# Altium PCB ePBR20_HVB_rev1.PcbDoc
Units mil, origin at the board's own origin, x right, y up, seen from the top; angles counter-clockwise.
Board outline 3050 x 7070 mil, 2 copper layers (Top Layer, Bottom Layer); 40 components, 32 nets, 117 pads, 17 vias.
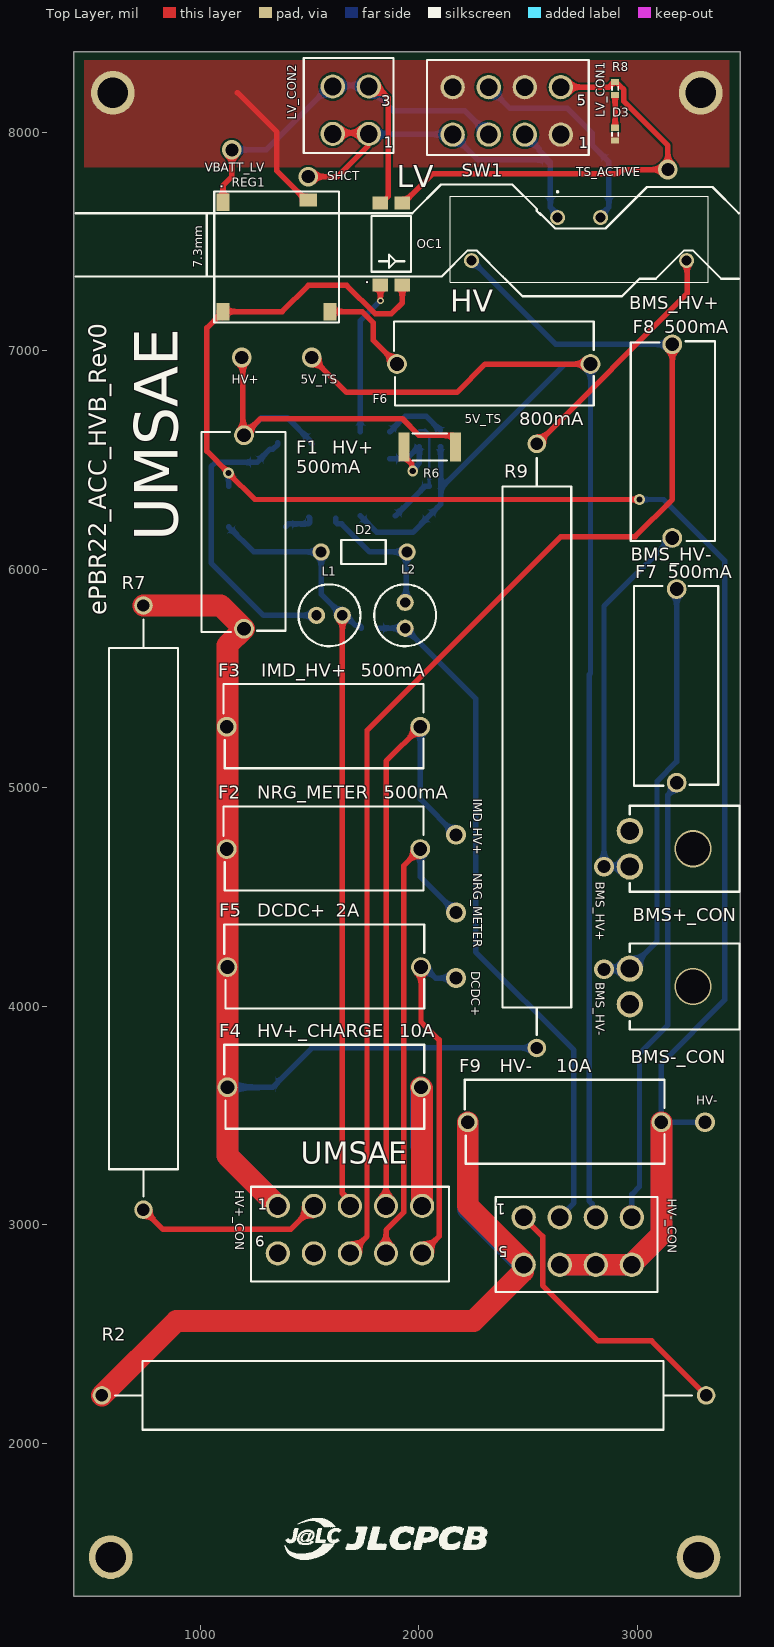
[diagram p0: Top Layer view]
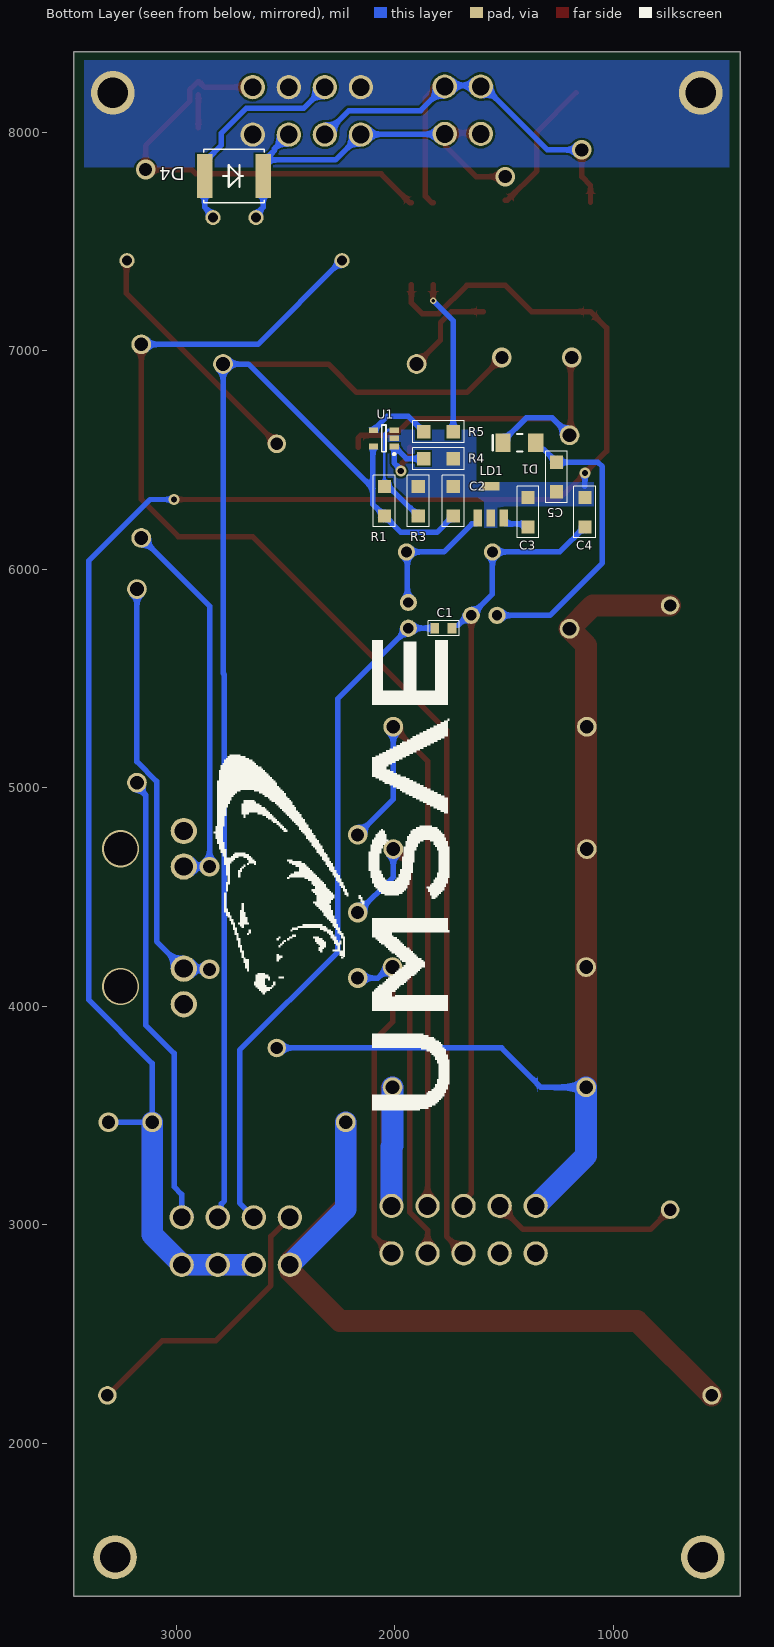
[diagram p1: Bottom Layer view, seen from below]
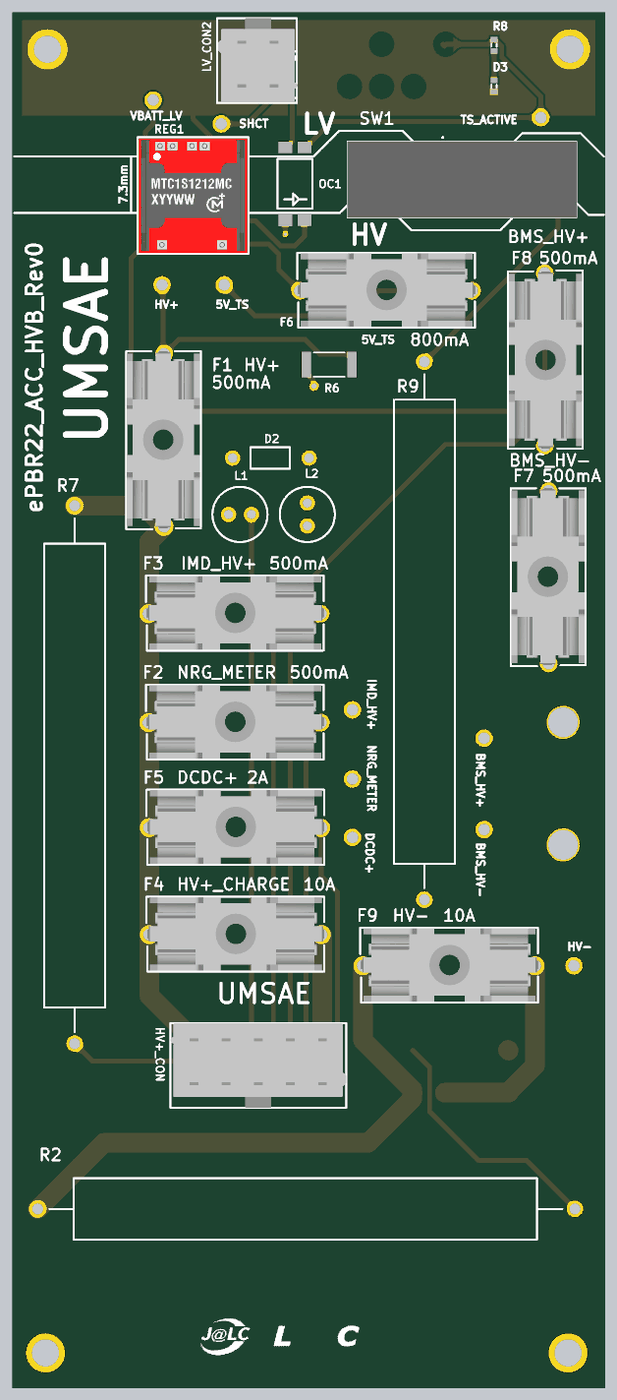
[diagram p2: 3D render of the assembled board from above, using the file's embedded part models]

## Layer stack, top to bottom
Top Solder: solder mask 0.4, Solder Resist, Dk 3.5
Top Layer: signal copper 1.4
Dielectric 1: dielectric 12.6, FR-4, Dk 4.8
Bottom Layer: signal copper 1.4
Bottom Solder: solder mask 0.4, Solder Resist, Dk 3.5

## Board outline
420,1300 3470,1300 3470,8370 420,8370

## Design rules (kind name [scope] priority, off if disabled: settings)
Clearance [All] p1: gap=10 ignorepadtopadclearanceinfootprint=FALSE
HoleSize [All] p1: absolutevalues=TRUE maxlimit=200 minlimit=15 maxpercent=80.000 minpercent=20.000
HoleToHoleClearance [All] p1: gap=8 allowstackedmicrovias=TRUE
MinimumAnnularRing MinimumAnnularRing_Pad [IsPad] p1: minimumring=7
MinimumAnnularRing MinimumAnnularRing_Via [IsVia] p2: minimumring=5
MinimumSolderMaskSliver [All] p1: minsoldermaskwidth=4
PlaneClearance [All] p1: clearance=15
PlaneConnect PlaneConnect_12V [InNet('12V')] p1: planeconnectstyle=Direct reliefexpansion=20 reliefentries=4 reliefconductorwidth=20 reliefairgap=10
PlaneConnect PlaneConnect_1 [All] p2: planeconnectstyle=Relief reliefexpansion=15 reliefentries=4 reliefconductorwidth=15 reliefairgap=10
PolygonConnect [All] p1: connectstyle=Direct reliefconductorwidth=15 reliefentries=4 polygonreliefangle="90 Angle" airgapwidth=10
RoutingVias [All] p1: holewidth=17 width=31 viastyle="Through Hole" minholewidth=15 minwidth=29 maxholewidth=50 maxwidth=100
SilkToSilkClearance [All] p1: silktosilkclearance=7
SilkToSolderMaskClearance [IsPad] p1: minsilkscreentomaskgap=2 clearancetoexposedcopper=TRUE
SolderMaskExpansion [All] p1: expansion=3 istentingtop=FALSE
Width [All] p1: maxlimit=200 minlimit=7 preferedwidth=15
23 further rules are at their usual default settings.

## Classes and differential pairs
net class "LV Class": SHCT
net class "HV+ Class": 300V_UNFUSED NetR9_1
component class Connectors: BMS+_CON BMS-_CON D4 HV+_CON HV+_CON1 HV-_CON HV-_CON1 LV_CON1 LV_CON2 R9 SW1
component class "TSAL & HV Indicators": C1 C2 C3 C4 C5 Cdd1 Cin1 Cin2 Co1 D1 D2 D3 F6 L1 L2 LD1 Lin1 OC1 R1 R3 R4 R5 R6 R8 REG1 U1
component class Fuses: F1 F2 F3 F4 F5 F7 F8 F9 R2 R7

## Components (designator, comment, footprint, x,y, rotation, side; value= is the part's Value field where it differs from the comment)
BMS+_CON "1-770966-0" "TE  1-770966-0 2POS CONN" 3845.52,5015 r270 top
BMS-_CON "1-770966-0" "TE  1-770966-0 2POS CONN" 3845.52,4385 r270 top
C1 "10nF" 0805R-GENERIC 1807.6,5730.94 r180 bottom
C2 "0.1uF" 1206R-GENERIC 1732.6,6380 r270 bottom
C3 "0.1uF" 1206R-GENERIC 1390,6330 r270 bottom
C4 "0.1uF" 1206R-GENERIC 1130,6330 r270 bottom
C5 "0.1uF" 1206R-GENERIC 1260,6490.4 r270 bottom
D1 "SMBJ5366B-TP" DO-214AA 1430,6580 r0 bottom
D2 "MUR160-TPMSCT-ND" DO-41 1750,6080 r180 top
D3 "" J1-0603 2898.42,7991.75 r270 top
D4 "S5GC-13-F" DO-214AB 2740,7800 r0 bottom
F1 "500mA" "FUSEHOLDER 5X20" 1200,6614.12 r270 top
F2 "500mA" "FUSEHOLDER 5X20" 2006.85,4720 r180 top
F3 "500mA" "FUSEHOLDER 5X20" 2006.85,5280 r180 top
F4 "10A" "FUSEHOLDER 5X20" 2010,3630 r180 top
F5 "2A" "FUSEHOLDER 5X20" 2010,4180 r180 top
F6 "750mA" "FUSEHOLDER 5X20" 2785.83,6940 r180 top
F7 "500mA" "FUSEHOLDER 5X20" 3180,5910 r270 top
F8 "500mA" "FUSEHOLDER 5X20" 3160,6144.17 r90 top
F9 "10A" "FUSEHOLDER 5X20" 3110,3470 r180 top
HV+_CON "" WM3804-ND 1717.5,3200 r180 top
HV-_CON "Header 8" WM3846-ND 5032.5,4083 r180 top
L1 "33mH" "Radial - 3mm" 1590.94,5790 r0 top
L2 "33mH" "Radial - 3mm" 1937.6,5790 r270 top
LD1 "HV9923N8-G" TO-243AA 1560.94,6310 r90 bottom
LV_CON1 "Header 8" WM3846-ND 97.5,6942 r0 top
LV_CON2 "Header 4" WM3801-ND 1208.75,7635 r0 top
OC1 "VO615A-3X017T" Optocoupler 1874.26,7490 r90 top
R1 "11K" 1206R-GENERIC 2047.34,6245 r90 bottom
R2 "1K" "AXIAL RESISTOR WW 14W" 2180,2220 r270 top
R3 "1.5K" 1206R-GENERIC 1892.6,6380 r270 bottom
R4 "1.1K" 1206R-GENERIC 1867.6,6506.62 r180 bottom
R5 "100" 1206R-GENERIC 1867.6,6630 r180 bottom
R6 "100K" RESC2512(6432)_N 2050,6560 r0 top
R7 "1K" "AXIAL RESISTOR WW 14W" 740,4700 r0 top
R8 "560" J1-0603 2898.43,8201.75 r90 top
R9 "1K" "AXIAL RESISTOR WW 14W" 2540,5440 r0 top
REG1 "MTC1S1205MC" MTC1S1205MC 1104.26,7680 r270 top
SW1 "S8-1204" S80504VU 2733.43,7511.57 r0 top
U1 "MCP6561UT" SOT-23-OT5_N 2050,6600 r0 bottom

## Footprints (in the part's own frame and the unit in brackets; to place one, negate y for a bottom-side part, rotate by r counter-clockwise, add the part's x,y. Pads: shape width x height; smd on the part's side, far side on the other; paste and mask are expansions set on the pad)
0805R-GENERIC [mil] "RESISTOR 0805"
  rect 40x50 smd: 1(-10,0) 2(70,0)
  silkscreen extent -40,-35 100,35, body extent -11,-25 70,25, height 27
1206R-GENERIC [mil]
  rect 60x60 smd: 1(0,0) 2(135,0)
  silkscreen extent -50,-50 185,50
"AXIAL RESISTOR WW 14W" [mil] "TE C141K0JL"
  round 85 hole 57: 1(0,1135) 2(0,-1630)
  silkscreen extent -157,-1570 157,1070, body extent -217,-1220 220,780, height 474
DO-41 [mm]
  round 2 hole 1.27: 1(-5,0) 2(5,0)
  silkscreen extent -2.5,-1.4 2.67,1.4, body extent -2.6,-1.35 2.6,1.35, height 2.69
DO-214AA [mil]
  rect 70x85 smd: 1(-74.8,0) 2(74.8,0)
  silkscreen extent -15,-40 122,40, body extent -94,-79 94,79, height 10
DO-214AB [mil]
  rect 70x200 smd: 1(-137.8,0) 2(129.92,0)
  silkscreen extent -142,-122 134,122, body extent -146,-120 138,120, height 98
"FUSEHOLDER 5X20" [mm]
  round 2.3 hole 1.6: 1(0,0) 2(22.5,0)
  silkscreen extent -0.37,-4.95 22.86,4.83, body extent -0.37,-4.9 22.73,4.7, height 11.5
J1-0603 [mm] "Chip Resistor, Body 1.6x0.8mm, IPC High Density"
  rect 0.7x0.9 smd: 1(-0.75,0) 2(0.75,0)
  silkscreen extent -0.2,-0.35 0.2,0.35, body extent -0.85,-0.48 0.85,0.48, height 0.9
MTC1S1205MC [mil]
  rect 80x60 smd: 1(0,0) 2(500,0) 4(500,490)
  rect 60x80 smd: 6(-10,390)
  silkscreen extent -50,-40 550,530, body extent -45,-35 545,525, height 440
Optocoupler [mm]
  rect 1.52x1.78 smd: 1(-4.78,1.27) 2(-4.76,-1.27) 3(4.76,-1.27) 4(4.76,1.27)
  silkscreen extent -3.25,-2.29 3.25,2.29, body extent -3.3,-2.29 3.3,2.29, height 4.5
"Radial - 3mm" [mm]
  round 2 hole 1.2: 1(-1.5,0) 2(1.5,0)
  silkscreen extent -3.6,-3.6 3.6,3.6, body extent -3.6,-3.6 3.6,3.6, height 8.5
RESC2512(6432)_N [mm] "Chip Resistor, Body 6.4x3.2mm, IPC Medium Density"
  rect 1.25x3.35 smd: 1(-3,0) 2(3,0)
  silkscreen extent -2,-1.57 2,1.58, body extent -3.25,-1.7 3.25,1.7, height 0.75
S80504VU [mm]
  round 1.755 hole 1.17: 1(-2.5,2.5) 2(2.5,2.5) 3(-12.5,-2.5) 4(12.5,-2.5)
  silkscreen extent -15,-5 15,5.6, body extent -15,-5 15,5, height 12
SOT-23-OT5_N [mm] "SOT23, 5-Leads, Body 2.9x1.7mm, Pitch 0.95mm, Lead Span 2.8mm, IPC Medium Density"
  rect 1.1x0.65 smd: 1(-1.2,0.95) 2(-1.2,0) 3(-1.2,-0.95) 4(1.2,-0.95) 5(1.2,0.95)
  silkscreen extent -1.32,-1.55 0.25,1.95, body extent -0.9,-1.55 0.9,1.55, height 1.45
"TE  1-770966-0 2POS CONN" [mil] "CONN HEADER R/A 2POS 4.14MM"
  round 120 hole 83: 1(375,-880) 2(212.01,-880)
  silkscreen extent 97,-880 490,-378, body extent 102,-901 541,-322, height 306
TO-243AA [mm]
  rect 2x1 smd: 1(-1.9,1.5) 2(-1.9,0) 3(-1.9,-1.5)
  rect 1x2 smd: 4(1.8,0)
  body extent -1.3,-2.3 1.3,2.3, height 1.6
WM3801-ND [mil] "CONN HEADER VERT 4POS 4.2MM"
  round 111 hole 81: 1(562.5,358) 2(397.5,358) 3(562.5,575) 4(397.5,575)
  silkscreen extent 265,270 675,705, body extent 270,273 679,707, height 504
WM3804-ND [mil] "CONN HEADER VERT 10POS 4.2MM"
  round 111 hole 81: 1(362.5,113) 2(197.5,113) 3(32.5,113) 4(-132.5,113) 5(-297.5,113) 6(362.5,330) 7(197.5,330) 8(32.5,330) 9(-132.5,330) 10(-297.5,330)
  silkscreen extent -420,25 485,459, body extent -420,26 485,459, height 504
WM3846-ND [mil] "CONN HEADER VERT 8POS 4.2MM"
  round 111 hole 81: 1(2552.5,1048) 2(2387.5,1048) 3(2222.5,1048) 4(2057.5,1048) 5(2552.5,1265) 6(2387.5,1265) 7(2222.5,1265) 8(2057.5,1265)
  silkscreen extent 1940,955 2680,1390, body extent 1940,956 2680,1389, height 504

## Part data
BMS+_CON BMS-_CON: library part "Header 2", "Header, 2-Pin", LatestRevisionDate=17-Jul-2002, LatestRevisionNote="Re-released for DXP Platform.", Publisher="Altium Limited"
C1: library part Cap, "885342207014:  CAP CER 10000PF 500V X7R 0805", Supplier Part Number 1=732-12169-1-ND, LatestRevisionDate=17-Jul-2002, LatestRevisionNote="Re-released for DXP Platform.", PackageDescription="Radial Cap, Thru-Hole; 2 Leads; 0.3 in Pin Spacing", PackageReference=RAD-0.3, Published=8-Jun-2000, Publisher="Altium Limited", Supplier 1=Digi-Key
C2 C3 C4 C5: library part Cap, "CGA5L4X7T2W104M160AA: CAP CER 0.1UF 450V X7T 1206", Supplier Part Number 1=445-12959-1-ND, LatestRevisionDate=17-Jul-2002, LatestRevisionNote="Re-released for DXP Platform.", PackageDescription="Radial Cap, Thru-Hole; 2 Leads; 0.3 in Pin Spacing", PackageReference=RAD-0.3, Published=8-Jun-2000, Publisher="Altium Limited", Supplier 1=Digi-Key
D1: library part "D Zener", "DIODE ZENER 39V 5W DO214AA", Power=5W, Supplier Part Number 1=SMBJ5366B-TPMSCT-ND, Voltage=39V, LatestRevisionDate=17-Jul-2002, LatestRevisionNote="Re-released for DXP Platform.", PackageDescription="Diode, Thru-Hole; 2 Leads; 0.7 in Pin Spacing", PackageReference=DIODE-0.7, Published=8-Jun-2000, Publisher="Altium Limited", Supplier 1=Digi-Key
D2: library part "Diode 1N914", "DIODE GEN PURP 600V 1A DO41", Code_JEDEC=DO-204-AH, ComponentLink1Description="Manufacturer Link", ComponentLink1URL=http://www.fairchildsemi.com/, ComponentLink2Description=Datasheet, ComponentLink2URL=http://www.fairchildsemi.com/ds/1N%2F1N4448.pdf, DatasheetVersion=1997, LatestRevisionDate=17-Jul-2002, LatestRevisionNote="Re-released for DXP Platform.", PackageDescription="Diode, Axial; Body 3.8 x 1.9 mm (LxDia. max), Lead Dia. 0.53 mm (max)", PackageReference=DO-35, Published=8-Jun-2000, Publisher="Altium Limited", Supplier 1=Digi-Key, Supplier Part Number 1=MUR160-TPMSCT-ND
D3: library part LED2, "Typical RED, GREEN, YELLOW, AMBER GaAs LED", SupplierPartNo=475-2512-1-ND, LatestRevisionDate=17-Jul-2002, LatestRevisionNote="Re-released for DXP Platform.", PackageDescription="SM LED; 2 Flat Leads", PackageReference=3.2X1.6X1.1, PackageVersion=Feb-2002, Published=8-Jun-2000, Publisher="Altium Limited"
D4: library part "DIODE 1N4001", "DIODE GEN PURP 400V 5A SMC", Supplier Part Number 1=S5GC-FDICT-ND, Supplier 1=Digi-Key
F1 F5 F6 F7 F8 F9: library part "Fuse 2", "0031.8201: FUSE BLOK CARTRIDGE 500V 10A PCB", LatestRevisionDate=17-Jul-2002, LatestRevisionNote="Re-released for DXP Platform.", PackageDescription="Thru-Hole; 2 Leads", PackageReference=PIN-W2/E2.8, Published=8-Jun-2000, Publisher="Altium Limited"
  F6: Supplier 2=Digi-Key, Supplier Part Number 2=486-1258-ND
F2 F3 F4: library part "Fuse 2", "0031.8201: FUSE BLOK CARTRIDGE 500V 10A PCB", Supplier Part Number 1=486-1258-ND, LatestRevisionDate=17-Jul-2002, LatestRevisionNote="Re-released for DXP Platform.", PackageDescription="Thru-Hole; 2 Leads", PackageReference=PIN-W2/E2.8, Published=8-Jun-2000, Publisher="Altium Limited", Supplier 1=Digi-Key
HV+_CON: library part "Header 10", "WM3804-ND", LatestRevisionDate=17-Jul-2002, LatestRevisionNote="Re-released for DXP Platform.", Publisher="Altium Limited", Supplier 1=Digi-Key, Supplier Part Number 1=WM3804-ND
HV-_CON LV_CON1: "Header, 8-Pin", Supplier Part Number 1=WM1354-ND, LatestRevisionDate=17-Jul-2002, LatestRevisionNote="Re-released for DXP Platform.", Publisher="Altium Limited", Supplier 1=Digi-Key
L1 L2: library part "Inductor Iron", "22R336C: FIXED IND 33MH 36MA 118.8 OHM TH", Supplier Part Number 1=811-1294-ND, LatestRevisionDate=17-Jul-2002, LatestRevisionNote="Re-released for DXP Platform.", PackageDescription="Axial Device, Thru-Hole; 2 Leads; 0.9 in Pin Spacing", PackageReference=AXIAL-0.9, Published=24-Mar-1999, Publisher="Altium Limited", Supplier 1=Digi-Key
LD1: library part 1-776163-5, "IC LED Driver AC DC Offline Switcher Triac Dimming 30mA Lighting SOT-89-3", Supplier Part Number 1=HV9923N8-GCT-ND, ComponentLink1Description=Datasheet, ComponentLink1URL=http://ww1.microchip.com/downloads/en/DeviceDoc/20005311A.pdf, Supplier 1=Digi-Key
LV_CON2: "Header, 4-Pin", Supplier Part Number 1=WM1352-ND, LatestRevisionDate=17-Jul-2002, LatestRevisionNote="Re-released for DXP Platform.", Publisher="Altium Limited", Supplier 1=Digi-Key
OC1: library part Optoisolator1, "OPTOISOLATR 5KV TRANSISTOR 4-SMD", Supplier Part Number 1=VO615A-3X017TCT-ND, ComponentLink1Description=Datasheet, ComponentLink1URL=http://www.vishay.com/docs/81753/vo615a.pdf, DatasheetVersion=Nov-2003, LatestRevisionDate=04-Mar-2005, LatestRevisionNote="Sch pins 3 & 4 Swapped.", PackageReference=DIP-4, Published=24-Mar-1999, Publisher="Altium Limited", Supplier 1=Digi-Key
R1: library part Res1, "KTR18EZPF1102: RES SMD 11K OHM 1% 1/4W 1206", Supplier Part Number 1=RHM11KAICT-ND, LatestRevisionDate=17-Jul-2002, LatestRevisionNote="Re-released for DXP Platform.", PackageDescription="Axial Device, Thru-Hole; 2 Leads; 0.3 in Pin Spacing", PackageReference=AXIAL-0.3, Published=8-Jun-2000, Publisher="Altium Limited", Supplier 1=Digi-Key
R2 R7 R9: library part Res3, "20J1K0E: RES 1K OHM 10W 5% AXIAL", Supplier Part Number 1=A129384-ND, LatestRevisionDate=29-May-2009, LatestRevisionNote="IPC-7351 Footprint Added.", PackageDescription="Chip Resistor", PackageReference=J1-0603, Published=8-Jun-2000, Publisher="Altium Limited", Supplier 1=Digi-Key
R3: library part Res1, "KTR18EZPF1501: RES SMD 1.5K OHM 1% 1/4W 1206", Supplier Part Number 1=RHM1.50KAICT-ND, LatestRevisionDate=17-Jul-2002, LatestRevisionNote="Re-released for DXP Platform.", PackageDescription="Axial Device, Thru-Hole; 2 Leads; 0.3 in Pin Spacing", PackageReference=AXIAL-0.3, Published=8-Jun-2000, Publisher="Altium Limited", Supplier 1=Digi-Key
R4: library part Res1, "RT1210BRD071K1L: RES SMD 1.1K OHM 0.1% 1/4W 1210", Supplier Part Number 1=YAG2209CT-ND, LatestRevisionDate=17-Jul-2002, LatestRevisionNote="Re-released for DXP Platform.", PackageDescription="Axial Device, Thru-Hole; 2 Leads; 0.3 in Pin Spacing", PackageReference=AXIAL-0.3, Published=8-Jun-2000, Publisher="Altium Limited", Supplier 1=Digi-Key, Supplier 2=Digi-Key, Supplier Part Number 2=A116033TR-ND
R5 R8: library part Res1, "KTR18EZPJ101: RES SMD 100 OHM 5% 1/4W 1206", Supplier Part Number 1=RHM100PCT-ND, LatestRevisionDate=17-Jul-2002, LatestRevisionNote="Re-released for DXP Platform.", PackageDescription="Axial Device, Thru-Hole; 2 Leads; 0.3 in Pin Spacing", PackageReference=AXIAL-0.3, Published=8-Jun-2000, Publisher="Altium Limited", Supplier 1=Digi-Key
R6: library part CMP-1018-00122-1, "HVCB2512FKC100K: RES SMD 100K OHM 1% 2W 2512", Case-EIA=2512, Case-Metric=6432, Power=2W, Supplier Part Number 1=HVCB2512FKC100KCT-ND, Tolerance="5 %", Supplier 1=Digi-Key, Technology=SMT
REG1: SupplierPartNo=811-3078-1-ND
SW1: library part S8-1204V_RS, "Relay or Contactor", Manufacturer_Name=Cynergy3, Manufacturer_Part_Number=S8-1204V/RS, RS Part Number=1245064, Supplier Part Number 1=725-1358-ND, Datasheet Link=http://uk.rs-online.com/web/p/products/1245064, Height=12mm, RS Price/Stock=http://uk.rs-online.com/web/p/products/1245064, Supplier 1=Digi-Key
U1: library part CMP-0187-00428-2, "1.8V Low Power Push-Pull Output Comparator, 5-Pin SOT-23, Extended Temperature Range, Tape and Reel", Supplier Part Number 1=MCP6561UT-E/OTCT-ND, Code_IPC=SOT23-5, ComponentLink1Description="Manufacturer URL", ComponentLink1URL=http://www.microchip.com/, ComponentLink2Description=Datasheet, ComponentLink2URL=http://ww1.microchip.com/downloads/en/DeviceDoc/22139b.pdf, ComponentLink3Description="Package Specification", ComponentLink3URL=http://www.microchip.com/stellent/groups/techpub_sg/documents/packagingspec/en012702.pdf, DatasheetVersion="revB, Aug-2009", PackageDescription="5-Lead Plastic Small Outline Transistor (OT) [SOT-23]", PackageReference=SOT-23-OT5, PackageVersion="revBB, Aug-2009", RevisionNote="URLs added.", Supplier 1=Digi-Key, Supplier 2=Digi-Key, Supplier Part Number 2=MCP6561UT-E/OTDKR-ND

## Free pads (board coordinates)
  round 200 hole 140: MH(590,1480) MH(600,8181) MH(3280,1480) MH(3290,8181)

## Via types
v1: diameter 90, hole 60, Top Layer to Bottom Layer, 11 vias
v2: diameter 50, hole 28, Top Layer to Bottom Layer, 3 vias
v3: diameter 170, hole 154, Top Layer to Bottom Layer, 2 vias
v4: diameter 31, hole 17, Top Layer to Bottom Layer, 1 vias

## Nets (pads, with @x,y where several pads share a name; then routed paths per layer and width w, separated by ;. In a path a pad name is that pad's centre, name@x,y a point inside that pad or via, vN(x,y) a via of type N, cw(c..) or ccw(c..) an arc to the next point about the centre after c; other vN are vias at no path point)
0V_UNFUSED: F7.2 HV-_CON.4 | length 2085.4
  Top Layer w100: HV-_CON.4@2970,3038 HV-_CON.4@2974,3034
  Bottom Layer w25: HV-_CON.4 2975,3140 3010,3175 3010,3785 3140,3915 3140,4966.44 3180,5006.44 F7.2
  Bottom Layer w100: HV-_CON.4@2970,3038 HV-_CON.4@2974,3034
5V_TS: C2.2 F6.1 HV-_CON.3 R1.1 U1.5 | length 6956.6
  Top Layer w25: v1(1510,6970) 1670,6810 2174.04,6810 2304.04,6940 F6.1
  Bottom Layer w25: C2.2 1807.6,6170 1972.34,6170 R1.1 2099.84,6297.5 2099.84,6369.84 ; U1.5 2099.55,6562.6 2099.84,6562.3 2099.84,6369.84 ; HV-_CON.3 2793.54,3051.46 2793.54,3096.46 2780,3110 2780,5478.22 2780,5518.22 2785.83,5524.04 F6.1 2670,6940 2099.84,6369.84
300V_UNFUSED: F8.2 HV+_CON.8 SW1.3 | length 6045.1
  Top Layer w25: HV+_CON.8 1763,2948 1763,5263 2650,6150 2990,6150 3160,6320 F8.2
  Bottom Layer w25: SW1.3@2243.71,7413.15 2626.86,7030 F8.2
BMS_HV+: BMS+_CON.1 F8.1 | length 1751.6
  Bottom Layer w25: BMS+_CON.1 v1(2847.5,4640) 2847.5,5831.67 F8.1
BMS_HV-: BMS-_CON.2 F7.1 | length 1945.1
  Bottom Layer w25: v1(2847.5,4170) 2850.49,4172.99 BMS-_CON.2 3090,4297.47 3090,5030.02 3180,5120.02 F7.1
DCDC+: F5.1 HV+_CON.10 | length 1557.4
  Top Layer w25: F5.1 2010,3930 2093,3847 2093,2948 HV+_CON.10
  Bottom Layer w25: F5.1 2027.06,4180 2077.06,4130 v1(2170,4130)
GND: D3.2 LV_CON1.1 LV_CON1.6 LV_CON1.8 pad.MH@600,8181 pad.MH@3290,8181 REG1.6 | length 631.9
  Top Layer w25: 1170,8181.75 1350,8001.75 1350,7824.26 1484.26,7690 REG1.6
HV+: F1.2 F2.2 F3.2 F4.2 F5.2 HV+_CON.1 R7.1 R9.2 | length 5401.5
  Top Layer w100: R7.1 1093.3,5835 F1.2 1124.17,5652.47 1124.17,5280 1124.17,4720 F5.2 F4.2 1124.17,3317.83 HV+_CON.1
  Bottom Layer w25: F4.2 1330.96,3630 1510.96,3810 R9.2
  Bottom Layer w100: F4.2 1124.17,3317.83 HV+_CON.1
HV+_CHARGE: F4.1 HV+_CON.5 | length 1090.1
  Top Layer w100: F4.1 2015,3625 HV+_CON.5
  Bottom Layer w100: F4.1 2010,3362.49 2015,3357.49 HV+_CON.5
HV+_FUSED: D1.2 F1.1 R6.2 | length 1837.2
  Top Layer w25: v1(1190,6970) 1195,6965 1195,6619.12 F1.1 1275.88,6690 1924.26,6690 2000.82,6613.44 2156,6613.44 2168.11,6601.34 R6.2
  Bottom Layer w25: F1.1 1280,6694.12 1398.18,6694.12 1504.8,6587.5 D1.2 D1.2@1511.86,6572.95
HV-: F9.2 HV-_CON.5 R2.2 | length 3710
  Top Layer w100: R2.2 890,2560 2250,2560 2477.9,2787.9 2477.9,2815.9 HV-_CON.5 2477.9,2820.1 2477.9,2834.31 2224.17,3088.04 F9.2
  Bottom Layer w100: F9.2 2224.17,3073.83 HV-_CON.5
HV-_FUSED: C2.1 C3.1 C4.1 C5.2 F9.1 HV-_CON.6 HV-_CON.7 HV-_CON.8 LD1.2 LD1.4 OC1.2 R3.1 R4.2 REG1.2 U1.2 | length 9310.3
  Top Layer w25: OC1.2 1924.26,7220 1874.76,7170.5 1799.62,7170.5 1670.12,7300 1494.26,7300 1374.26,7180 REG1.2 1030,7105.74 1030,6540.86 v2(1130,6440.86) 1130,6440 1250,6320 v2(3010,6320) v2@3020,6320
  Top Layer w100: HV-_CON.6 HV-_CON.7 HV-_CON.8 2975,2820.98 3110,2955.98 F9.1
  Bottom Layer w25: 1130,6380.87 v2(1130,6440.86) ; v2(3010,6320) 3120,6320 3400,6040 3400,4030 3110,3740 F9.1 v1(3310,3470)
  Bottom Layer w100: HV-_CON.6 HV-_CON.7 HV-_CON.8 2975,2820.98 3110,2955.98 F9.1
HV_IND_LED+: C1.2 C4.2 D2.2 HV+_CON.3 L1.2 | length 3644
  Top Layer w25: L1.2@1657.5,5782.5 L1.2 1650,3145.27 1685,3110.27 HV+_CON.3
  Bottom Layer w25: C4.2 1245,6080 D2.2 1553.15,5886.85 L1.2 1664.54,5790 1711.1,5743.44 1730.1,5743.44 1737.6,5735.94 C1.2
HV_IND_LED-: C1.1 HV-_CON.2 L2.2 | length 3162.8
  Bottom Layer w25: C1.1 L2.2 2260,5408.54 2260,4250 2710,3800 2710,3101.52 2645,3036.52 HV-_CON.2
IMD_HV+: F3.1 HV+_CON.4 | length 2820
  Top Layer w25: HV+_CON.4 1850,5123.15 F3.1
  Bottom Layer w25: F3.1 2006.85,4948.67 v1(2170,4785.52)
NetC3_2: C3.2 LD1.3 | length 146.9
  Bottom Layer w25: C3.2 1403.33,6208.33 1494.7,6208.33 1501.89,6215.51 LD1.3 LD1.3@1497.09,6240
NetC5_1: C5.1 D1.1 L1.1 | length 1376.5
  Bottom Layer w25: D1.1 1355.2,6572.5 1332.7,6550 1319.6,6550 C5.1 1070.4,6490.4 1050,6470 1050,6030 1290,5790 L1.1
NetD2_1: D2.1 L2.1 LD1.1 | length 637.4
  Bottom Layer w25: LD1.1 1620,6215.51 1627.19,6208.33 1646.87,6208.33 1775.2,6080 D2.1 1942.22,6075.37 1942.22,5853.68 L2.1
NetD3_1: D3.1 R8.1 | length 150.9
  Top Layer w25: D3.1 R8.1
NetF6_2: F6.2 REG1.4 | length 452.4
  Top Layer w25: REG1.4 1740.62,7180 1790.62,7130 1790.62,7049.38 F6.2
NetOC1_1: OC1.1 R5.2 | length 709.8
  Top Layer w25: v4(1824.26,7230) OC1.1
  Bottom Layer w25: R5.2 1732.6,7138.34 v4(1824.26,7230)
NetR1_2: R1.2 R3.2 U1.3 | length 503.3
  Bottom Layer w12: U1.3 2031.42,6637.4 2047.34,6621.48 R1.2
  Bottom Layer w25: R3.2 2027.6,6380 R1.2
NetR4_1: R4.1 R6.1 U1.1 | length 410.3
  Top Layer w25: R6.1 1931.89,6518.66 1967.56,6482.99 1967.56,6454.78 v2(1972.34,6450)
  Bottom Layer w25: R4.1 1946.78,6506.62 U1.1 2002.76,6487.18 1972.34,6456.76 v2(1972.34,6450)
NetR5_1: R5.1 U1.4 | length 284.6
  Bottom Layer w25: R5.1 1937.6,6700 2034.65,6700 U1.4
NetR9_1: R9.1 SW1.4 | length 1123.1
  Top Layer w25: R9.1 3227.96,7262.96 SW1.4@3227.96,7413.15
NRG_METER: F2.1 HV+_CON.9 | length 2282.5
  Top Layer w25: HV+_CON.9 1850,2976.69 1930.38,3057.07 1930.38,4643.53 F2.1
  Bottom Layer w25: F2.1 2006.85,4593.15 v1(2170,4430) v1@2170,4440
PCHRG_CTRL: D4.2 LV_CON1.7 SW1.2 | length 1005.5
  Top Layer w25: SW1.2@2823.41,7618.44 SW1.2
  Bottom Layer w25: LV_CON1.7 2417,8110 2680,8110 2794.92,7995.08 2794.92,7940 2869.92,7865 D4.2 2869.92,7657.59 2834.26,7621.93 SW1.2@2834.26,7610
SHCT: D4.1 LV_CON1.2 LV_CON1.4 LV_CON2.1 LV_CON2.2 SW1.1 | length 1904.9
  Top Layer w25: v1(1494.26,7797.5) 1627.5,7797.5 1766.04,7936.04 1766.04,8013.92 LV_CON2.1@1771.25,8019.12 ; LV_CON2.2@1606.25,7998.21 LV_CON2.1@1760,7998.21
  Bottom Layer w25: LV_CON2.1 1772.75,7991.5 2153.5,7991.5 LV_CON1.4 2271.16,7873.84 2579.7,7873.84 2595.37,7858.17 D4.1@2602.2,7851.34 ; LV_CON2.1@1782.5,8019.12 LV_CON2.1@1785.31,8021.94 ; LV_CON1.2 2550.76,7924.24 2550.76,7916.44 2586.54,7880.67 2602.2,7865 D4.1@2602.2,7851.34 ; SW1.1@2637.41,7610 2637.41,7621.93 2602.2,7657.14 D4.1 D4.1@2602.2,7851.34
TS_ACTIVE: LV_CON1.5 OC1.3 R8.2 | length 2054.3
  Top Layer w25: OC1.3 1929.38,7677.4 2061.98,7810 2910,7810 2930,7830 v1(3140,7830) 3140,7940 2938.64,8141.36 2938.64,8195.32 2921.64,8212.32 2921.32,8212.32 2902.36,8231.28 R8.2 2894.49,8231.28 2870.21,8207 LV_CON1.5 ; LV_CON1.5@2635,8207 LV_CON1.5@2644.19,8197.81
TSMP_HV+: HV+_CON.2 R7.2 | length 872.2
  Top Layer w25: R7.2 830,2980 1413,2980 HV+_CON.2
  Bottom Layer w25: HV+_CON.2 HV+_CON.2@1527.5,3094.5
TSMP_HV-: HV-_CON.1 R2.1 | length 1304.4
  Top Layer w25: HV-_CON.1 2567,2948 2567,2723 2820,2470 3065,2470 R2.1
VBATT_LV: LV_CON1.3 LV_CON2.3 LV_CON2.4 OC1.4 REG1.1 | length 2274.7
  Top Layer w25: REG1.1 1104.26,7757.5 1144.26,7797.5 v1(1144.26,7920) ; LV_CON2.3@1782.5,8236.12 1860.5,8158.12 1860.5,7708.52 1829.38,7677.4 OC1.4
  Bottom Layer w25: v1(1144.26,7920) 1301.38,7920 LV_CON2.4@1617.5,8236.12 ; LV_CON2.4@1606.25,8215.21 LV_CON2.3@1771.25,8215.21 ; LV_CON2.3 1881.25,8100 2210,8100 LV_CON1.3
pads on no net: BMS+_CON.2 BMS-_CON.1 HV+_CON.6 HV+_CON.7
copper on no net:
  other v3: 3254.5,4091.5 3254.5,4721.5

## Polygon pours and split planes (outlines as drawn)
HV-_FUSED on Bottom Layer "Bottom Layer-HV-_FUSED" (solid, pour order 14): 2050,6330 2050,6640 1626.4,6640 1626.4,6400 1090,6400 1090,6290 1490,6290 1530,6281.85 1530,6190 1590,6190 1590,6310 1622.6,6330
GND on Bottom Layer "Bottom Layer-GND" (solid, pour order 8): 470,8330 470,7840 3420,7840 3420,8330
GND on Top Layer "Top Layer-GND" (solid, pour order 4): 470,8330 3420,8330 3420,7840 470,7840

## Silkscreen, mask and mechanical layers (free items; w line width, h text height)
Top Overlay:
  drawing of 39 lines, arcs and shapes, not listed
  text "VBATT_LV" at 1020,7820 h40
  text "TS_ACTIVE" at 2720,7800 h40
  text "SHCT" at 1580,7780 h40
  text "LV" at 1900,7750 h100
  text "7.3mm" at 1010,7380 h40 r90
  text "BMS_HV+" at 2962.94,7190 h60
  text "HV" at 2143.46,7180 h100
  text "500mA" at 3122.94,7080 h60
  text "HV+" at 1144.26,6850 h40
  text "5V_TS" at 1459.3,6850 h40
  text "5V_TS" at 2210,6670 h40
  text "800mA" at 2460,6660 h60
  text "HV+" at 1603.86,6530 h60
  text "500mA" at 1438.86,6440 h60
  text "UMSAE" at 897.48,6130 h200 r90
  text "BMS_HV-" at 2970,6040 h60
  text "500mA" at 3140,5960 h60
  text "ePBR22_ACC_HVB_Rev0" at 570,5790 h80 r90
  text "IMD_HV+" at 1280,5510 h60
  text "500mA" at 1735,5510 h60
  text "NRG_METER" at 1260,4950 h60
  text "500mA" at 1840,4950 h60
  text "IMD_HV+" at 2250,4950 h40 r270
  text "NRG_METER" at 2250,4610 h40 r270
  text "BMS_HV+" at 2810,4570 h40 r270
  text "DCDC+" at 1260,4410 h60
  text "2A" at 1620,4410 h60
  text "DCDC+" at 2240,4160 h40 r270
  text "BMS_HV-" at 2810,4110 h40 r270
  text "HV+_CHARGE" at 1260,3860 h60
  text "10A" at 1910,3860 h60
  text "HV-" at 2370,3700 h60
  text "10A" at 2630,3700 h60
  text "HV-" at 3270,3550 h40
  text "UMSAE" at 1460,3280 h100
Bottom Overlay:
  drawing of 25 lines, arcs and shapes, not listed
Board Outline:
  the board outline again, w10

## Text inside footprints (layer, text, board x,y; h text height)
HV+_CON: Top Overlay "6" at 1252.5,2900 h50; Top Overlay "1" at 1262.5,3070 h50
HV-_CON: Top Overlay "1" at 2397.5,3098 h50 r180; Top Overlay "5" at 2407.5,2903 h50 r180
LV_CON1: Top Overlay "1" at 2732.5,7927 h50; Top Overlay "5" at 2722.5,8122 h50
LV_CON2: Top Overlay "3" at 1828.75,8120 h50; Top Overlay "1" at 1838.75,7930 h50